# Altium PCB EVSE_Monitor.PcbDoc (part 1 of 2)
Units mm, origin at the board's own origin, x right, y up, seen from the top; angles counter-clockwise.
Board outline 130 x 100 mm, 2 copper layers (Top Layer, Bottom Layer), stack 1.581 mm thick; 132 components, 83 nets, 447 pads, 252 vias.
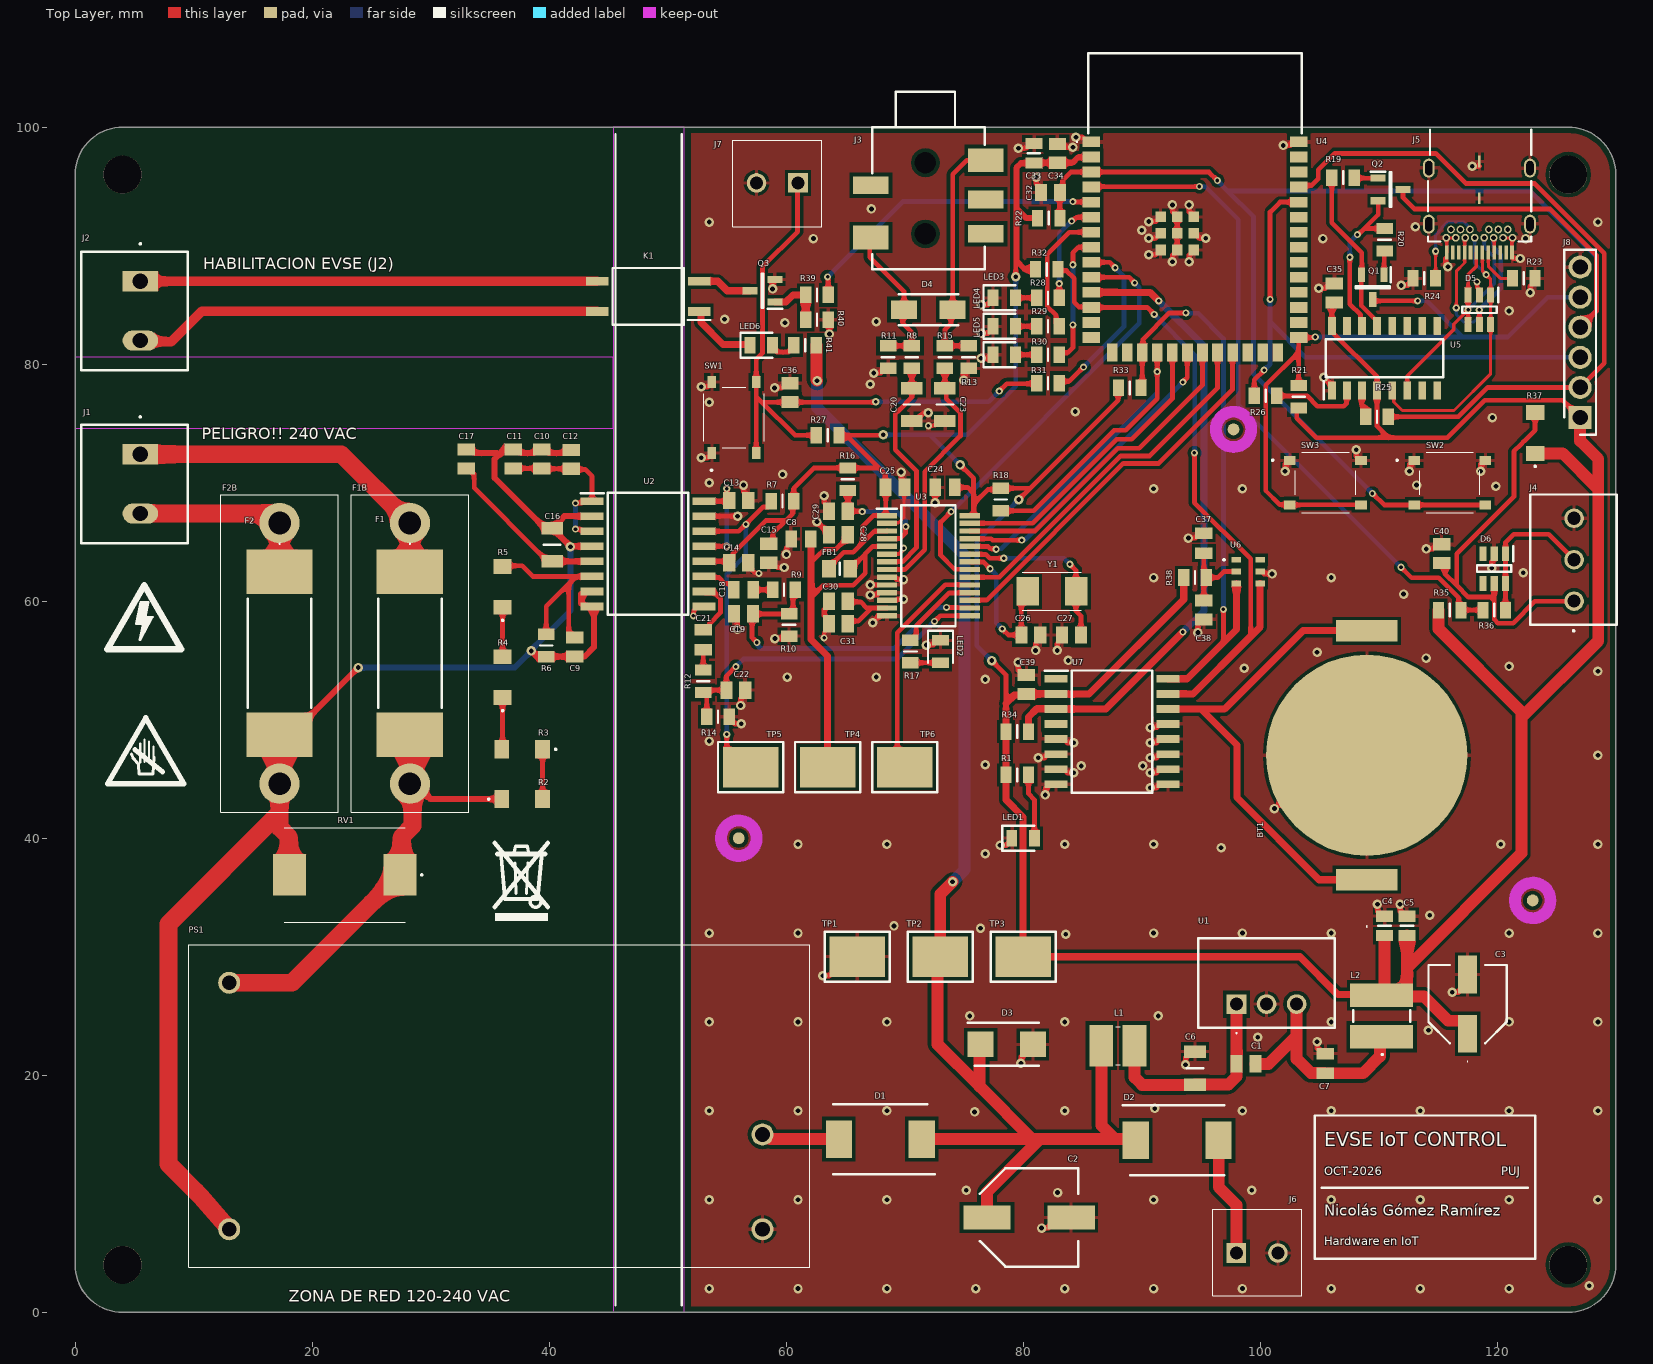
[diagram p0: Top Layer view]
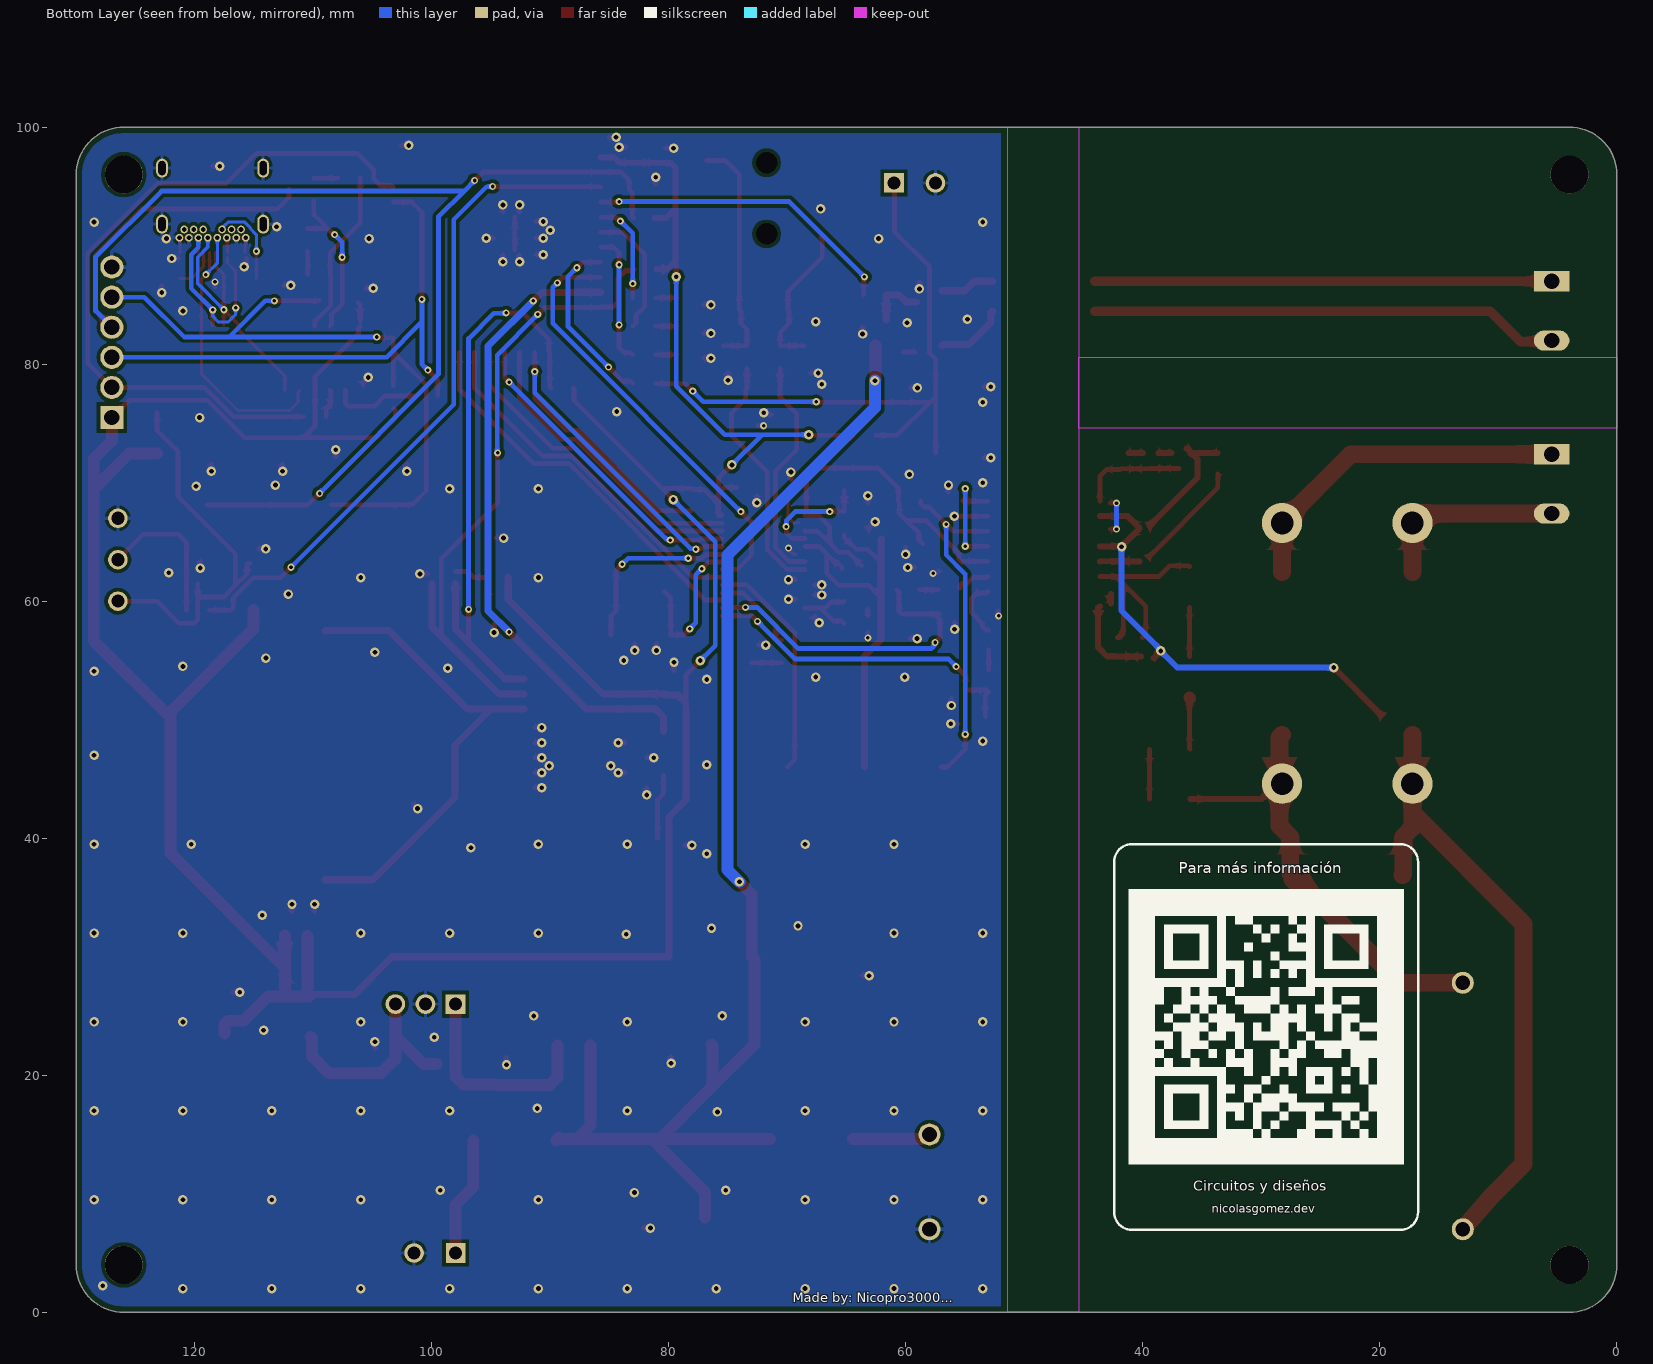
[diagram p1: Bottom Layer view, seen from below]
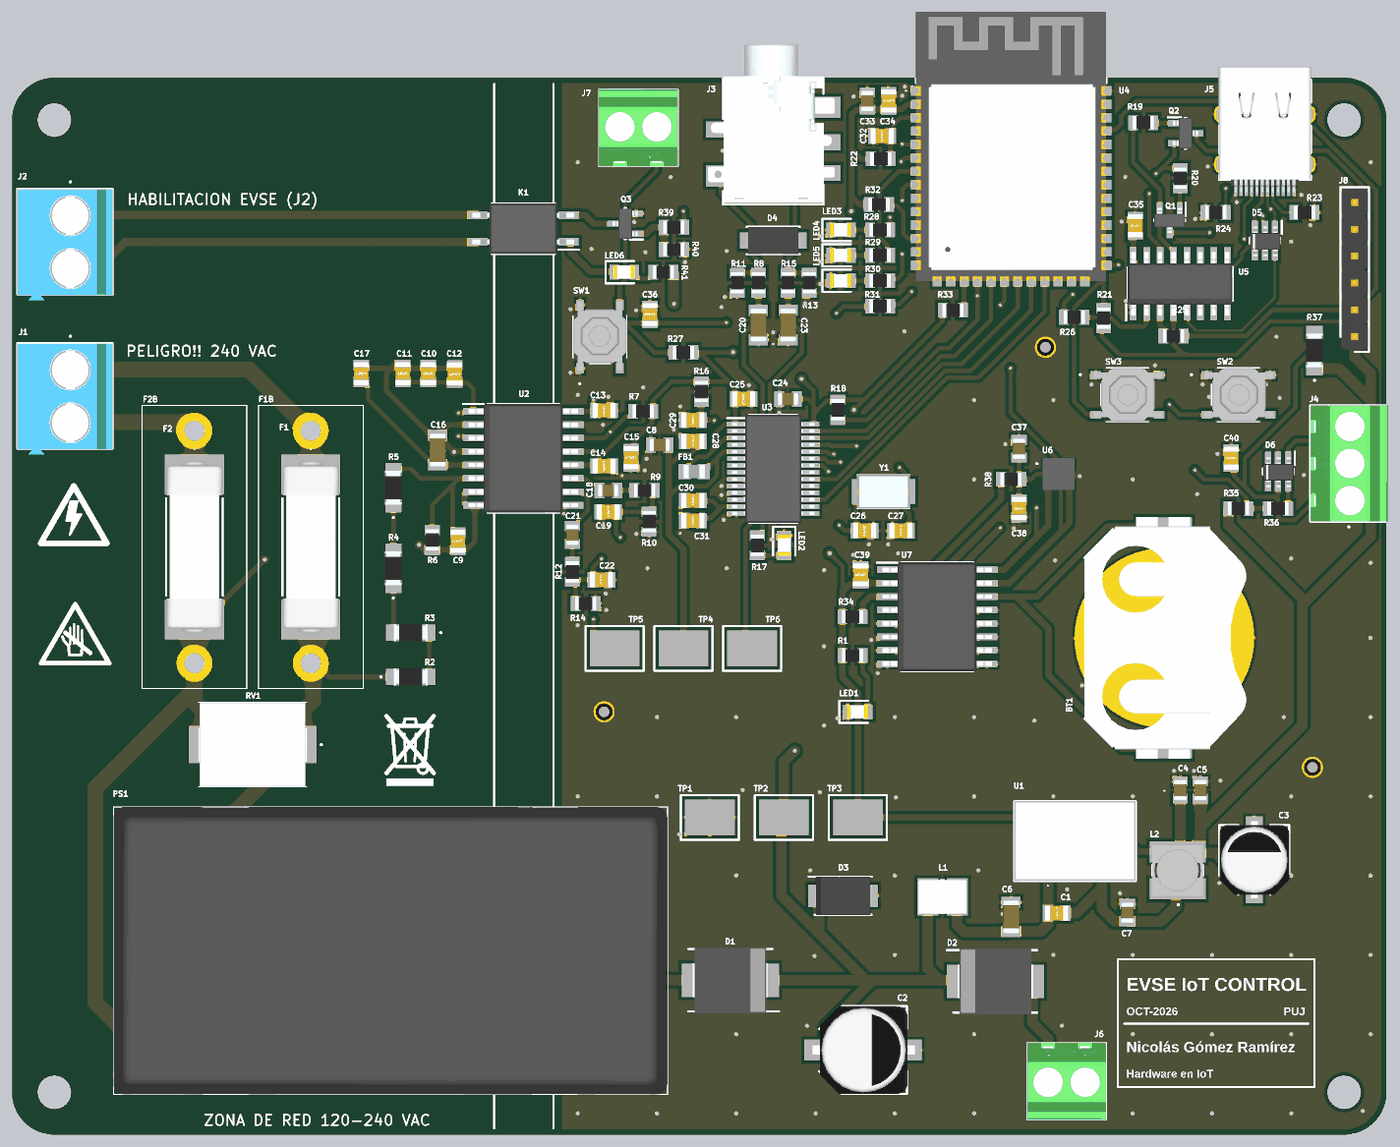
[diagram p3: 3D render of the assembled board from above, using the file's embedded part models]

## Layer stack, top to bottom
Top Solder: solder mask 0.0102, Solder Resist, Dk 3.5
Top Layer: signal copper 0.0356
Dielectric 1: dielectric 1.51, FR-4, Dk 4.4
Bottom Layer: signal copper 0.0356
Bottom Solder: solder mask 0.0102, Solder Resist, Dk 3.5

## Board outline
4,0 126,0 ccw(c126,4) 130,4 130,96 ccw(c126,96) 126,100 4,100 ccw(c4,96) 0,96 0,4 ccw(c4,4)

## Design rules (kind name [scope] priority, off if disabled: settings)
BoardOutlineClearance Borde_HV [InNetClass('HV_AC') Or InNetClass('EVSE_EXT')] p1: gap=1 ignorepadtopadclearanceinfootprint=FALSE // Red y EVSE: 1 mm al borde
BoardOutlineClearance [All] p2: gap=0.3 ignorepadtopadclearanceinfootprint=FALSE // PCBWay >= 0,25 mm
Clearance HV_SELV [InNetClass('HV_AC') vs Not InNetClass('HV_AC') And Not IsKeepOut] p1: gap=6.4 ignorepadtopadclearanceinfootprint=FALSE // Red - resto (incluido GND): reforzado, 6,4 mm
Clearance EVSE_resto [InNetClass('EVSE_EXT') vs Not InNetClass('EVSE_EXT') And Not IsKeepOut] p2: gap=6.4 ignorepadtopadclearanceinfootprint=FALSE // J2 de potencial desconocido: 6,4 mm a todo
Clearance L1_L2 [InNet('AC_L1') Or InNet('AC_L1_F') Or InNet('HV_D1') Or InNet('HV_D2') vs InNet('AC_L2') Or InNet('AC_L2_F') Or InNet('HV_INP') Or InNet('HV_DCDC') Or InNet('HV_LDO')] p3: gap=3.2 ignorepadtopadclearanceinfootprint=FALSE // Funcional L1-L2 (hasta 373 Vpk)
Clearance EVSE_pads_K1 [InNet('EVSE_EN_A') And InComponent('K1') vs InNet('EVSE_EN_B') And InComponent('K1')] p4: gap=1.7 ignorepadtopadclearanceinfootprint=FALSE // Pads 3 y 4 de K1 (1,79 mm)
Clearance EVSE_A_B [InNet('EVSE_EN_A') vs InNet('EVSE_EN_B')] p5: gap=1.5 ignorepadtopadclearanceinfootprint=FALSE // Salida de K1 (hasta 400 Vpk)
Clearance HV_interna [InNetClass('HV_AC') vs InNetClass('HV_AC')] p6: gap=0.5 ignorepadtopadclearanceinfootprint=FALSE // Dentro de la red (escalones de 93 Vpk; U2 0,62 mm)
Clearance J5_pads [InComponent('J5') vs InComponent('J5')] p7: gap=0.145 ignorepadtopadclearanceinfootprint=FALSE // Patron de Wurth: pads de 0,65 mm a 0,8 mm (0,15 mm entre pads)
Clearance Poligono_GND [InPolygon] p8: gap=0.3 ignorepadtopadclearanceinfootprint=FALSE // Poligonos de GND a 0,3 mm del resto
Clearance [All] p9: gap=0.2 ignorepadtopadclearanceinfootprint=FALSE // General SELV (PCBWay 0,1 mm)
ComponentClearance Cautin_K1 [InComponent('K1')] p1: gap=2 collisioncheckmode=3 verticalgap=2 showdistances=FALSE // K1 se suelda a mano por arriba: 2 mm libres (U1 es THT)
ComponentClearance F1B_anidado [InComponent('F1B') vs Not (InComponent('F1') Or InComponent('F1B'))] p2: gap=0.25 collisioncheckmode=3 verticalgap=0.25 showdistances=FALSE // F1B (DNP) va sobre F1: solo se revisa contra el resto
ComponentClearance F2B_anidado [InComponent('F2B') vs Not (InComponent('F2') Or InComponent('F2B'))] p3: gap=0.25 collisioncheckmode=3 verticalgap=0.25 showdistances=FALSE // F2B (DNP) va sobre F2: solo se revisa contra el resto
ComponentClearance [Not (InComponent('F1B') Or InComponent('F2B')) vs Not (InComponent('F1B') Or InComponent('F2B'))] p4: gap=0.25 collisioncheckmode=3 verticalgap=0.25 showdistances=FALSE // Cuerpos SMD: 0,25 mm
Creepage Creepage_HV [InNetClass('HV_AC') vs Not InNetClass('HV_AC')] p1: checkdistance=6.4 applytopolygonpour=TRUE // Reforzado red - SELV
Creepage Creepage_EVSE [InNetClass('EVSE_EXT') vs Not InNetClass('EVSE_EXT')] p2: checkdistance=6.4 applytopolygonpour=TRUE // J2 de potencial desconocido
Creepage Creepage_L1_L2 [InNet('AC_L1') Or InNet('AC_L1_F') Or InNet('HV_D1') Or InNet('HV_D2') vs InNet('AC_L2') Or InNet('AC_L2_F') Or InNet('HV_INP') Or InNet('HV_DCDC') Or InNet('HV_LDO')] p3: checkdistance=3.2 applytopolygonpour=TRUE // Funcional L1-L2
DiffPairsRouting USB_90 [All] p1: maxlimit=0.25 minlimit=0.15 mostfreqgap=0.15 toplayer_minwidth=0.2 toplayer_maxwidth=0.55 toplayer_prefwidth=0.5 bottomlayer_minwidth=0.2 bottomlayer_maxwidth=0.55 bottomlayer_prefwidth=0.5 maxuncoupledlength=30 // USB Full Speed: 0,50 / 0,15 / GND 0,15 -> 92,6 ohm; 30 mm sin acoplar (FS no es critico)
HoleSize [All] p1: absolutevalues=TRUE maxlimit=6 minlimit=0.3 maxpercent=80.000 minpercent=20.000 // PCBWay sin costo extra: 0,3-6,0 mm
HoleToHoleClearance [All] p1: gap=0.4 allowstackedmicrovias=TRUE // PCBWay: 0,41 mm entre agujeros de piezas
MinimumAnnularRing Anillo_J5 [InComponent('J5')] p1: minimumring=0.12 // Wurth: agujero 0,4 / pad 0,65 (pin 0,28 x 0,25); pedir a PCBWay que no lo cambie
MinimumAnnularRing Anillo [All] p2: minimumring=0.15 // PCBWay: anillo >= 0,15 mm
MinimumSolderMaskSliver Mascara_J5 [InComponent('J5')] p1: minsoldermaskwidth=0 // Pads de J5 a 0,8 mm: apertura de mascara corrida
MinimumSolderMaskSliver [All] p2: minsoldermaskwidth=0.1 // Puente de mascara verde >= 0,1 mm
PolygonConnect Polygon_vias [IsVia] p1: connectstyle=Direct reliefconductorwidth=0.3 reliefentries=4 polygonreliefangle="90 Angle" airgapwidth=0.25 // Vias directas al poligono
PolygonConnect [All] p2: connectstyle=Relief reliefconductorwidth=0.3 reliefentries=4 polygonreliefangle="90 Angle" airgapwidth=0.25 // Pads con 4 rayos de 0,3 mm (se sueldan bien)
RoutingVias Vias_potencia [InNet('AC_L1') Or InNet('AC_L2') Or InNet('AC_L1_F') Or InNet('AC_L2_F') Or InNet('+VIN') Or InNet('VIN_ACDC') Or InNet('VIN_BANCO') Or InNet('+3V3') Or InNet('+3V3A') Or InNet('GND')] p1: holewidth=0.4 width=0.8 viastyle="Through Hole" minholewidth=0.3 minwidth=0.6 maxholewidth=0.4 maxwidth=0.8 // Potencia: 0,4 / 0,8 mm
RoutingVias Vias [All] p2: holewidth=0.3 width=0.6 viastyle="Through Hole" minholewidth=0.3 minwidth=0.6 maxholewidth=0.4 maxwidth=0.8 // Senal: 0,3 / 0,6 mm (anillo 0,15)
SilkToSilkClearance [All] p1: silktosilkclearance=0 // Sin revision serigrafia-serigrafia
SilkToSolderMaskClearance [All] p1: minsilkscreentomaskgap=0.05 clearancetoexposedcopper=FALSE // PCBWay recorta la serigrafia sobre pads
SolderMaskExpansion Vias_tapadas [IsVia] p1: expansion=0 istentingtop=TRUE // Vias tapadas con mascara en Top y Bottom
SolderMaskExpansion [All] p2: expansion=0.05 istentingtop=FALSE // PCBWay: apertura >= 2 mil
SupplyNets "Schematic Supply Nets_3" [InNet('+VIN')] p1: voltage=0.000
SupplyNets "Schematic Supply Nets_2" [InNet('+3V3A')] p2: voltage=0.000
SupplyNets "Schematic Supply Nets_1" [InNet('GND')] p3: voltage=0.000
SupplyNets "Schematic Supply Nets" [InNet('+3V3')] p4: voltage=0.000
Width Ancho_USB [InNet('USB_DP') Or InNet('USB_DN')] p1: maxlimit=0.6 minlimit=0.2 preferedwidth=0.3 // USB Full Speed: 0,3 mm para entrar a los pads de J5 (0,3 mm)
Width Ancho_red [InNet('AC_L1') Or InNet('AC_L2') Or InNet('AC_L1_F') Or InNet('AC_L2_F')] p2: maxlimit=3 minlimit=0.5 preferedwidth=1.5 // Troncos de red 1,5 mm; ramales a U2 y condensadores 0,5
Width Ancho_HV [InNetClass('HV_AC')] p3: maxlimit=3 minlimit=0.3 preferedwidth=0.4 // Senales del lado de red
Width Ancho_EVSE [InNetClass('EVSE_EXT')] p4: maxlimit=2 minlimit=0.4 preferedwidth=0.8 // Salida de K1 <= 120 mA
Width Ancho_12V [InNet('+VIN') Or InNet('VIN_ACDC') Or InNet('VIN_BANCO')] p5: maxlimit=2.5 minlimit=0.5 preferedwidth=1 // 12 V hasta 1,67 A: troncos 1,0; ramal a R41 0,5
Width Ancho_3V3 [InNet('+3V3') Or InNet('+3V3A')] p6: maxlimit=2 minlimit=0.25 preferedwidth=0.4 // 3,3 V <= 0,5 A (0,4 entra a los pads de U3)
Width Ancho_GND [InNet('GND')] p7: maxlimit=3 minlimit=0.25 preferedwidth=0.3 // GND: pistas finas, los poligonos lo refuerzan
Width [All] p8: maxlimit=2 minlimit=0.2 preferedwidth=0.25 // Senales
23 further rules are at their usual default settings.

## Classes and differential pairs
net class USB: USB_DN USB_DP
net class HV_AC: AC_L1 AC_L1_F AC_L2 AC_L2_F HV_D1 HV_D2 HV_D3 HV_DCDC HV_INP HV_LDO
net class EVSE_EXT: EVSE_EN_A EVSE_EN_B
net class ANALOG: AMC_OUTN AMC_OUTP ATM_IN ATM_IP ATM_VN ATM_VP CT_N CT_P NetC18_2 NetC21_2 NetJ3_3 NetJ3_11
component class SENSORES: BT1 C37 C38 C39 C40 D6 J4 R32 R33 R34 R35 R36 R37 R38 U6 U7
component class MEDICION: C9 C10 C11 C12 C13 C14 C15 C16 C17 C18 C19 C20 C21 C22 C23 C24 C25 C26 C27 C28 C29 C30 C31 D4 J3 LED2 R2 R3 R4 R5 R6 R7 R8 R9 R10 R11 R12 R13 R14 R15 R16 R17 R18 TP5 TP6 U2 U3 Y1
component class MCU: C32 C33 C34 C35 C36 D5 J5 J7 J8 LED3 LED4 LED5 Q1 Q2 R19 R20 R21 R22 R23 R24 R25 R26 R27 R28 R29 R30 R31 SW1 SW2 SW3 U4 U5
component class ALIMENTACION: C1 C2 C3 C4 C5 C6 C7 C8 D1 D2 D3 F1 F1B F2 F2B FB1 J1 J6 L1 L2 LED1 PS1 R1 RV1 TP1 TP2 TP3 TP4 U1
component class ACTUACION: J2 K1 LED6 Q3 R39 R40 R41
differential pair USB_D: +USB_DP -USB_DN

## Components (designator, comment, footprint, x,y, rotation, side; value= is the part's Value field where it differs from the comment)
BT1 "BAT-HLD-001" BATHLD001 109,47 r90 top value=CR2032
C1 "C0805C102J5GAC-TU" CAPC2012X88N 98.806,20.955 r180 top value="1nF 50V C0G"
C2 "EEE-FK1V101P" EEHZT1E331UP 80.5,8 r0 top value="100uF 35V"
C3 "EEE-FK1C101P" EEE1AA101SP 117.5,26 r90 top value="100uF 16V"
C4 "CL21A226MAQNNNE" CAPC2012X140N 110.5,32.6 r90 top value="22uF 25V"
C5 "CL21A226MAQNNNE" CAPC2012X140N 112.4,32.6 r90 top value="22uF 25V"
C6 "CL31B106KBHNNNE" CAPC3216X180N 94.5,20.6 r90 top value="10uF 50V"
C7 "CL21A106KAYNNNE" CAPC2012X145N 105.5,21 r90 top value="10uF 25V"
C8 "CL21A106KAYNNNE" CAPC2012X145N 61.25,65.25 r180 top value="10uF 25V"
C9 "C0805C102J5GAC-TU" CAPC2012X88N 42.164,56.134 r270 top value="1nF 50V C0G"
C10 "CL21B105KAFNNNE" CAPC2012X88N 39.37,72.009 r90 top value="1uF 25V X7R"
C11 "C0805C102J5GAC-TU" CAPC2012X88N 36.957,72.009 r90 top value="1nF 50V C0G"
C12 "CL21B104KBCNNNC" CAPC2012X88N 41.857,71.975 r90 top value="100nF 50V X7R"
C13 "CL21B104KBCNNNC" CAPC2012X88N 56,68.5 r0 top value="100nF 50V X7R"
C14 "CL21B105KAFNNNE" CAPC2012X88N 56,63.25 r0 top value="1uF 25V X7R"
C15 "C0805C102J5GAC-TU" CAPC2012X88N 58.547,64.046 r270 top value="1nF 50V C0G"
C16 "GRM31C5C1H104JA01L" CAPC3216X180N 40.259,64.77 r90 top value="100nF 50V C0G"
C17 "C0805C102J5GAC-TU" CAPC2012X88N 33.02,72.009 r90 top value="1nF 50V C0G"
C18 "CL21A106KAYNNNE" CAPC2012X145N 56.388,60.96 r0 top value="10uF 25V"
C19 "C0805C472J5GACTU" CAPC2012X88N 56.388,58.928 r180 top value="4.7nF 50V C0G"
C20 "GRM3195C1H333JA01D" CAPC3216X180N 70.6,76.6 r270 top value="33nF 50V C0G"
C21 "CL21A106KAYNNNE" CAPC2012X145N 53,56.75 r270 top value="10uF 25V"
C22 "C0805C472J5GACTU" CAPC2012X88N 55.75,52.5 r0 top value="4.7nF 50V C0G"
C23 "GRM3195C1H333JA01D" CAPC3216X180N 73.4,76.6 r270 top value="33nF 50V C0G"
C24 "CL21A106KAYNNNE" CAPC2012X145N 73.4,69.6 r180 top value="10uF 25V"
C25 "CL21B104KBCNNNC" CAPC2012X88N 69.2,69.6 r0 top value="100nF 50V X7R"
C26 "C0805C120J5GACTU" CAPC2012X88N 80.645,57.15 r0 top value="12pF 50V C0G"
C27 "C0805C120J5GACTU" CAPC2012X88N 84.074,57.15 r180 top value="12pF 50V C0G"
C28 "CL21B104KBCNNNC" CAPC2012X88N 64.4,65.6 r180 top value="100nF 50V X7R"
C29 "CL21B104KBCNNNC" CAPC2012X88N 64.4,67.6 r180 top value="100nF 50V X7R"
C30 "CL21B105KAFNNNE" CAPC2012X88N 64.4,60 r180 top value="1uF 25V X7R"
C31 "C0805C102J5GAC-TU" CAPC2012X88N 64.4,58.1 r180 top value="1nF 50V C0G"
C32 "CL21B105KAFNNNE" CAPC2012X88N 82.296,94.488 r0 top value="1uF 25V X7R"
C33 "CL21A226MAQNNNE" CAPC2012X140N 80.9,97.8 r270 top value="22uF 25V"
C34 "CL21B104KBCNNNC" CAPC2012X88N 82.9,97.8 r270 top value="100nF 50V X7R"
C35 "CL21B104KBCNNNC" CAPC2012X88N 106.25,86 r270 top value="100nF 50V X7R"
C36 "CL21B104KBCNNNC" CAPC2012X88N 60.325,77.597 r270 top value="100nF 50V X7R"
C37 "CL21A106KAYNNNE" CAPC2012X145N 95.25,64.897 r270 top value="10uF 25V"
C38 "CL21B104KBCNNNC" CAPC2012X88N 95.25,59.25 r90 top value="100nF 50V X7R"
C39 "CL21B104KBCNNNC" CAPC2012X88N 80.264,52.959 r270 top value="100nF 50V X7R"
C40 "CL21B104KBCNNNC" CAPC2012X88N 115.316,64.008 r270 top value="100nF 50V X7R"
D1 "SS34-E3_57T" DIOM7959X262N 67.945,14.605 r180 top value="40V 3A"
D2 "SS34-E3_57T" DIOM7959X262N 93,14.5 r0 top value="40V 3A"
D3 "SMBJ15A" DIOM5436X244N 78.613,22.606 r0 top value="15V 600W"
D4 "SMAJ5.0CA" DIONM5026X229N 72,84.6 r180 top value="5V TVS bidir"
D5 "USBLC6-2SC6" SOT95P280X145-6N 118.5,84.6 r270 top value="ESD USB"
D6 "USBLC6-2SC6" SOT95P280X145-6N 119.75,62.75 r270 top value="ESD USB"
F1 "3403.0274.11" 3403027423 28.25,55.6 r270 top value="T1A 277VAC"
F1B "BLX-A" BLX-A_5X20 28.25,55.6 r270 top value="5x20 6.3A 250V"
F2 "3403.0274.11" 3403027423 17.25,55.6 r270 top value="T1A 277VAC"
F2B "BLX-A" BLX-A_5X20 17.25,55.6 r270 top value="5x20 6.3A 250V"
FB1 "BLM21PG221SN1D" BEADC2012X105N 64.516,62.738 r0 top value=220R@100MHz
J1 "XY301V-A-5.0-2P" TB001-500-02BE 5.5,72.4 r90 top value="2P 5.0mm 300V"
J2 "XY301V-A-5.0-2P" TB001-500-02BE 5.5,87 r90 top value="2P 5.0mm 300V"
J3 "SJ1-3515-SMT-TR" SJ13515SMTTR 72,95.5 r0 top value="jack 3.5mm"
J4 "1751251" 1751251 126.5,60 r90 top value="3P 3.5mm"
J5 "632723300011" 632723300011 118.5,95.35 r180 top value="USB-C 16P USB2.0"
J6 "1751248" 1751248 98,5 r0 top value="2P 3.5mm"
J7 "1751248" 1751248 61,95.3 r180 top value="2P 3.5mm"
J8 "61300611121" HDRV6W79P0X254_1X6_1524X254X894P 127,75.5 r90 top value="1x6 2.54mm"
K1 "AQY414EHAX" SOP254P962X315-4N 48.35,85.73 r180 top value="NC 400V 120mA"
L1 "LQH43NH120J03L" RLS126 88,22.5 r0 top value=12uH
L2 "SRR4028-2R2Y" SRR4028 110.25,25 r0 top value=2.2uH
LED1 "APT2012SGC" LEDC2012X85N 80,40 r0 top value=verde
LED2 "APT2012SGC" LEDC2012X85N 73.025,55.753 r270 top value=verde
LED3 "APT2012SGC" LEDC2012X85N 78.4,85.6 r0 top value=verde
LED4 "APT2012SGC" LEDC2012X85N 78.4,83.2 r0 top value=verde
LED5 "APT2012SURCK" LEDC2012X85N 78.4,80.8 r0 top value=rojo
LED6 "KT-0805Y" LEDC2012X85N 57.9,81.6 r0 top value=amarillo
PS1 "IRM-20-12" IRM2012 13,7 r0 top value="12V 1.8A"
Q1 "MMBT3904LT1G" SOT96P237X111-3N 109.5,86.5 r270 top value="NPN 40V 0.2A"
Q2 "MMBT3904LT1G" SOT96P237X111-3N 111,94.75 r0 top value="NPN 40V 0.2A"
Q3 "AO3400A" SOT96P237X111-3N 58,86.2 r180 top value="NMOS 30V 5.7A"
R1 "RC0805FR-071KL" RESC2012X60N 79.502,45.339 r0 top value=1k
R2 "ERJ-P08F1004V" ERJP08_(1206) 37.719,43.307 r0 top value="1M 1206"
R3 "ERJ-P08F1004V" ERJP08_(1206) 37.719,47.498 r180 top value="1M 1206"
R4 "ERJ-P08F1004V" ERJP08_(1206) 36.068,53.594 r90 top value="1M 1206"
R5 "ERJ-P08F1004V" ERJP08_(1206) 36.068,61.214 r90 top value="1M 1206"
R6 "ERA-6AEB103V" RESC2012X60N 39.751,56.261 r270 top value="10k 0.1%"
R7 "RC0805FR-0747KL" RESC2012X60N 59.69,68.453 r180 top value=47k
R8 "RC0805FR-071KL" RESC2012X60N 70.6,80.6 r270 top value=1k
R9 "ERA-6AEB203V" RESC2012X60N 59.817,60.96 r0 top value="20k 0.1%"
R10 "ERA-6AEB133V" RESC2012X60N 60.25,58 r270 top value="13k 0.1%"
R11 "RT0805BRD0710RL" RESC2012X60N 68.6,80.6 r90 top value="10R 0.1%"
R12 "ERA-6AEB203V" RESC2012X60N 53,53.25 r270 top value="20k 0.1%"
R13 "RT0805BRD0710RL" RESC2012X60N 75.4,80.6 r270 top value="10R 0.1%"
R14 "ERA-6AEB133V" RESC2012X60N 54.25,50.25 r0 top value="13k 0.1%"
R15 "RC0805FR-071KL" RESC2012X60N 73.4,80.6 r270 top value=1k
R16 "RC0805FR-0710KL" RESC2012X60N 65.2,70.3 r270 top value=10k
R17 "RC0805FR-071KL" RESC2012X60N 70.485,55.753 r270 top value=1k
R18 "RC0805FR-0710KL" RESC2012X60N 78.105,68.58 r270 top value=10k
R19 "RC0805FR-0712KL" RESC2012X60N 107,95.75 r0 top value=12k
R20 "RC0805FR-0712KL" RESC2012X60N 110.5,90.5 r270 top value=12k
R21 "RC0805FR-074K7L" RESC2012X60N 103.25,77.25 r270 top value=4.7k
R22 "RC0805FR-0710KL" RESC2012X60N 82.169,92.329 r180 top value=10k
R23 "RC0805FR-075K1L" RESC2012X60N 122.25,87.25 r180 top value=5.1k
R24 "RC0805FR-075K1L" RESC2012X60N 113.853,87.249 r0 top value=5.1k
R25 "RC0805FR-071KL" RESC2012X60N 109.855,75.565 r180 top value=1k
R26 "RC0805FR-071KL" RESC2012X60N 100.457,77.343 r180 top value=1k
R27 "RC0805FR-0710KL" RESC2012X60N 63.5,74 r0 top value=10k
R28 "RC0805FR-071KL" RESC2012X60N 82.1,85.6 r0 top value=1k
R29 "RC0805FR-071KL" RESC2012X60N 82.1,83.2 r0 top value=1k
R30 "RC0805FR-071KL" RESC2012X60N 82.1,80.8 r0 top value=1k
R31 "RC0805FR-071KL" RESC2012X60N 82.1,78.4 r0 top value=1k
R32 "RC0805FR-074K7L" RESC2012X60N 82,88 r180 top value=4.7k
R33 "RC0805FR-074K7L" RESC2012X60N 89,78 r180 top value=4.7k
R34 "RC0805FR-0710KL" RESC2012X60N 79.5,49 r0 top value=10k
R35 "RC0805FR-074K7L" RESC2012X60N 116,59.25 r180 top value=4.7k
R36 "RC0805FR-07100RL" RESC2012X60N 119.75,59.25 r0 top value=100R
R37 "RC1206FR-0768RL" ERJP08_(1206) 123.2,74.2 r90 top value="68R 1206"
R38 "RC0805FR-07330RL" RESC2012X60N 94.5,62 r0 top value=330R
R39 "RC0805FR-071KL" RESC2012X60N 62.6,85.85 r180 top value=1k
R40 "RC0805FR-0710KL" RESC2012X60N 62.6,83.75 r180 top value=10k
R41 "RC0805FR-071KL" RESC2012X60N 61.6,81.6 r0 top value=1k
RV1 "RL4032P471KJ" CU4032 22.75,36.9 r180 top value=300VAC
SW1 "TS-1187A-B-A-B" TS1187ABAB 55.6,75.5 r90 top value="pulsador 5.1mm"
SW2 "TS-1187A-B-A-B" TS1187ABAB 116,70 r0 top value="pulsador 5.1mm"
SW3 "TS-1187A-B-A-B" TS1187ABAB 105.5,70 r0 top value="pulsador 5.1mm"
TP1 "5016" KEYSTONE-5016_V 66,30 r0 top value=TP
TP2 "5016" KEYSTONE-5016_V 73,30 r0 top value=TP
TP3 "5016" KEYSTONE-5016_V 80,30 r0 top value=TP
TP4 "5016" KEYSTONE-5016_V 63.5,46 r0 top value=TP
TP5 "5016" KEYSTONE-5016_V 57,46 r0 top value=TP
TP6 "5016" KEYSTONE-5016_V 70,46 r0 top value=TP
U1 "R-78CK3.3-0.5" R78CK3305 98,26 r0 top value="3.3V 0.5A"
U2 "AMC3330DWER" SOIC127P1030X265-16N 48.35,64 r0 top value="±1V iso amp"
U3 "ATM90E26-YU-R" SOP65P778X199-28N 72,63 r0 top value="energy meter"
U4 "ESP32-S3-WROOM-1-N16R2" ESP32S3WROOM1N16R2 94.5,93.5 r0 top value="N16R2 16MB/2MB"
U5 "CH340C" SOIC127P600X175-16N 110.5,80.5 r90 top value=USB-UART
U6 "AHT20" AHT20 99,62.5 r0 top value="T/HR I2C 0x38"
U7 "DS3231SN" SOIC127P1030X265-16N 87.5,49 r0 top value="RTC TCXO 2ppm"
Y1 "ECS-81.92-12-30Q-EN-TR" ECS81921230QENTR 82.423,60.833 r180 top value="8.192MHz 12pF"

## Footprints (in the part's own frame and the unit in brackets; to place one, negate y for a bottom-side part, rotate by r counter-clockwise, add the part's x,y. Pads: shape width x height; smd on the part's side, far side on the other; paste and mask are expansions set on the pad)
1751248 [mm]
  rect 1.65x1.65 hole 1.1: 1(0,0)
  round 1.65 hole 1.1: 2(3.5,0)
  silkscreen extent -2,-3.6 5.5,3.7, body extent -2,-3.6 5.5,3.7, height 8.5
1751251 [mm]
  round 1.65 hole 1.1: 1(0,0) 2(3.5,0) 3(7,0)
  silkscreen extent -2.55,-3.6 9,3.7, body extent -2,-3.6 9,3.7, height 8.5
3403027423 [mm]
  rect 3.75x5.6 smd: 1(-6.875,0) 2(6.875,0)
  silkscreen extent -9.3,-2.68 4.6,2.68, body extent -8.1,-2.68 8.1,2.68, height 5.36
632723300011 [mm] "USB 3.1 Type C Receptacle Horizontal THR"
  rect 0.3x1.2 smd: A1(-2.75,5.93) A2(-2.25,5.93) A3(-1.75,5.93) A4(-1.25,5.93) A5(-0.75,5.93) A6(-0.25,5.93) A7(0.25,5.93) A8(0.75,5.93) A9(1.25,5.93) A10(1.75,5.93) A11(2.25,5.93) A12(2.75,5.93)
  round 0.65 hole 0.4: B1(2.8,4.68) B2(2.4,3.98) B3(1.6,3.98) B4(1.2,4.68) B5(0.8,3.98) B6(0.4,4.68) B7(-0.4,4.68) B8(-0.8,3.98) B9(-1.2,4.68) B10(-1.6,3.98) B11(-2.4,3.98) B12(-2.8,4.68) Shell(-2,4.68) Shell(2,4.68)
  oval 1x1.6 hole 0.6 slot 1.2 at 90 deg: Shell(-4.27,3.53) Shell(-4.27,-1.2) Shell(4.27,3.53) Shell(4.27,-1.2)
  rect 0.2x1 smd: Shell(0,1.35) Shell(0,-1.75)
  silkscreen extent -4.37,-4.45 4.34,5, body extent -4.37,-5.62 4.37,6.2, height 3.05
AHT20 [mm]
  rect 0.8x0.5 smd: 1(-1,1) 2(-1,0) 3(-1,-1) 4(1,-1) 5(1,0) 6(1,1)
  silkscreen extent -2.1,0.95 -2,1.05, body extent -1.5,-1.5 1.5,1.5, height 1.2
BATHLD001 [mm]
  rect 1.8x5.2 smd: 1(-10.5,0) 2(10.5,0)
  round 17 smd paste-8.5: 3(0,0)
  silkscreen extent -14.5,-0.05 -14.4,0.05, body extent -11.43,-7.75 11.43,7.74, height 4.32
BEADC2012X105N [mm]
  rect 1.15x1.45 smd: 1(-0.9,0) 2(0.9,0)
  silkscreen extent 0,-0.53 0,0.53, body extent -1,-0.63 1,0.63, height 1.05
BLX-A_5X20 [mm] "Portafusible 5x20 BLX-A, pines a 22 mm"
  round 3.4 hole 1.9: 1(-11,0) 2(11,0)
  silkscreen extent -13.4,-4.95 13.4,4.95
CAPC2012X88N [mm]
  rect 1.02x1.47 smd: 1(-0.8,0) 2(0.8,0)
  body extent -1.1,-0.72 1.1,0.73, height 0.88
CAPC2012X140N [mm]
  rect 0.94x1.43 smd: 1(-0.82,0) 2(0.82,0)
  silkscreen extent 0,-0.53 0,0.53, body extent -1,-0.63 1,0.63, height 1.4
CAPC2012X145N [mm]
  rect 0.97x1.47 smd: 1(-0.83,0) 2(0.83,0)
  body extent -1,-0.63 1,0.63, height 1.45
CAPC3216X180N [mm]
  rect 1.05x1.82 smd: 1(-1.39,0) 2(1.39,0)
  silkscreen extent 0,-0.7 0,0.7, body extent -1.6,-0.8 1.6,0.8, height 1.8
CU4032 [mm]
  rect 2.8x3.5 smd: 1(-4.65,0) 2(4.65,0)
  silkscreen extent -6.55,-4 5.1,4, body extent -5.15,-4 5.15,4, height 3.46
DIOM5436X244N [mm]
  rect 2.2x2.15 smd: 1(-2.2,0) 2(2.2,0)
  silkscreen extent -3.27,-1.81 2.7,1.81, body extent -2.7,-1.81 2.7,1.81, height 2.44
DIOM7959X262N [mm]
  rect 2.2x3.15 smd: 1(-3.5,0) 2(3.5,0)
  silkscreen extent -4.6,-2.95 3.97,2.95, body extent -3.56,-3.11 3.56,3.11, height 2.67
DIONM5026X229N [mm]
  rect 2.2x1.55 smd: 1(-2.05,0) 2(2.05,0)
  silkscreen extent -2.52,-1.3 2.52,1.3, body extent -2.52,-1.3 2.52,1.3, height 2.29
ECS81921230QENTR [mm]
  rect 1.9x2.4 smd: 1(-2.05,0) 2(2.05,0)
  silkscreen extent -2.5,-1.6 2.5,1.6, body extent -2.54,-1.6 2.5,1.6, height 1.1
EEE1AA101SP [mm]
  rect 3.2x1.6 smd: 1(-2.5,0) 2(2.5,0)
  silkscreen extent -4.88,-3.3 3.3,3.3, body extent -3.65,-3.3 3.65,3.3, height 5.8
EEHZT1E331UP [mm]
  rect 4x2 smd: 1(-3.55,0) 2(3.55,0)
  silkscreen extent -4.15,-4.15 4.15,4.15, body extent -4.79,-4.15 4.91,4.15, height 10.2
ERJP08_(1206) [mm]
  rect 1.25x1.55 smd: 1(-1.725,0) 2(1.725,0)
  silkscreen extent -2.87,-0.05 -2.78,0.05, body extent -1.6,-0.8 1.6,0.8, height 0.6
ESP32S3WROOM1N16R2 [mm]
  rect 1.5x0.9 smd: 1(-8.75,5.26) 2(-8.75,3.99) 3(-8.75,2.72) 4(-8.75,1.45) 5(-8.75,0.18) 6(-8.75,-1.09) 7(-8.75,-2.36) 8(-8.75,-3.63) 9(-8.75,-4.9) 10(-8.75,-6.17) 11(-8.75,-7.44) 12(-8.75,-8.71) 13(-8.75,-9.98) 14(-8.75,-11.25) 27(8.75,-11.25) 28(8.75,-9.98) 29(8.75,-8.71) 30(8.75,-7.44) 31(8.75,-6.17) 32(8.75,-4.9) 33(8.75,-3.63) 34(8.75,-2.36) 35(8.75,-1.09) 36(8.75,0.18) 37(8.75,1.45) 38(8.75,2.72) 39(8.75,3.99) 40(8.75,5.26)
  rect 0.9x1.5 smd: 15(-6.985,-12.5) 16(-5.715,-12.5) 17(-4.445,-12.5) 18(-3.175,-12.5) 19(-1.905,-12.5) 20(-0.635,-12.5) 21(0.635,-12.5) 22(1.905,-12.5) 23(3.175,-12.5) 24(4.445,-12.5) 25(5.715,-12.5) 26(6.985,-12.5)
  rect 0.9x0.9 smd: 41(-1.5,-2.46) 42(-2.9,-1.06) 43(-2.9,-2.46) 44(-2.9,-3.86) 45(-1.5,-3.86) 46(-0.1,-3.86) 47(-0.1,-2.46) 48(-0.1,-1.06) 49(-1.5,-1.06)
  silkscreen extent -10,5.21 9,12.75, body extent -9,-12.75 9,12.75, height 3.25
HDRV6W79P0X254_1X6_1524X254X894P [mm]
  rect 1.95x1.95 hole 1.3: 1(0,0)
  round 1.95 hole 1.3: 2(2.54,0) 3(5.08,0) 4(7.62,0) 5(10.16,0) 6(12.7,0)
  silkscreen extent -1.45,-1.35 14.15,1.35, body extent -1.27,-1.27 13.97,1.27, height 8.54
IRM2012 [mm]
  round 1.86 hole 1.24: 1(0,0) 2(45,0) 3(45,8) 4(0,20.8)
  silkscreen extent -3.4,-3.2 49,24, body extent -3.42,-3.2 48.98,24, height 24
KEYSTONE-5016_V [mm] "Testpoint, Body 3.81x2.04 mm"
  rect 4.7x3.43 smd: 1(0,0)
  silkscreen extent -2.75,-2.12 2.75,2.11, body extent -1.9,-1.02 1.9,1.02, height 2.29
LEDC2012X85N [mm]
  rect 0.9x1.4 smd: 1(-0.95,0) 2(0.95,0)
  silkscreen extent -1.75,-1.05 0.95,1.05, body extent -1.03,-0.63 0.97,0.63, height 0.75
R78CK3305 [mm]
  rect 1.665x1.665 hole 1.11: 1(0,0)
  round 1.665 hole 1.11: 2(2.54,0) 3(5.08,0)
  silkscreen extent -3.21,-2.5 8.29,5.55, body extent -3.21,-2 8.29,5.55, height 10.43
RESC2012X60N [mm]
  rect 0.95x1.4 smd: 1(-0.95,0) 2(0.95,0)
  silkscreen extent 0,-0.53 0,0.53, body extent -1,-0.63 1,0.63, height 0.6
RLS126 [mm]
  rect 2x3.5 smd: 1(-1.4,0) 2(1.4,0)
  silkscreen extent -0.2,-1.6 0.2,1.6, body extent -2.25,-1.6 2.25,1.6, height 2.6
SJ13515SMTTR [mm]
  rect 3x2 smd: 1(4.85,1.7) 2(-4.85,-4.8)
  rect 3x1.5 smd: 3(4.85,-4.5) 10(-4.85,-0.4) 11(4.85,-1.6)
  round 0.9 hole 1.8 unplated: 12(-0.25,-4.5) 13(-0.25,1.5)
  silkscreen extent -4.75,-7.5 4.75,7.5, body extent -6.19,-7.34 5.81,7.66, height 5.08
SOIC127P600X175-16N [mm]
  rect 1.525x0.65 smd: 1(-2.712,4.445) 2(-2.712,3.175) 3(-2.712,1.905) 4(-2.712,0.635) 5(-2.712,-0.635) 6(-2.712,-1.905) 7(-2.712,-3.175) 8(-2.712,-4.445) 9(2.712,-4.445) 10(2.712,-3.175) 11(2.712,-1.905) 12(2.712,-0.635) 13(2.712,0.635) 14(2.712,1.905) 15(2.712,3.175) 16(2.712,4.445)
  silkscreen extent -3.47,-4.95 1.6,5.12, body extent -3.01,-4.94 3.01,4.96, height 1.75
SOIC127P1030X265-16N [mm]
  rect 1.95x0.65 smd: 1(-4.725,4.445) 2(-4.725,3.175) 3(-4.725,1.905) 4(-4.725,0.635) 5(-4.725,-0.635) 6(-4.725,-1.905) 7(-4.725,-3.175) 8(-4.725,-4.445) 9(4.725,-4.445) 10(4.725,-3.175) 11(4.725,-1.905) 12(4.725,-0.635) 13(4.725,0.635) 14(4.725,1.905) 15(4.725,3.175) 16(4.725,4.445)
  silkscreen extent -5.7,-5.15 3.4,5.15, body extent -5.17,-5.15 5.17,5.15, height 2.59
SOP65P778X199-28N [mm]
  rect 1.705x0.45 smd: 1(-3.498,4.225) 2(-3.498,3.575) 3(-3.498,2.925) 4(-3.498,2.275) 5(-3.498,1.625) 6(-3.498,0.975) 7(-3.498,0.325) 8(-3.498,-0.325) 9(-3.498,-0.975) 10(-3.498,-1.625) 11(-3.498,-2.275) 12(-3.498,-2.925) 13(-3.498,-3.575) 14(-3.498,-4.225) 15(3.498,-4.225) 16(3.498,-3.575) 17(3.498,-2.925) 18(3.498,-2.275) 19(3.498,-1.625) 20(3.498,-0.975) 21(3.498,-0.325) 22(3.498,0.325) 23(3.498,0.975) 24(3.498,1.625) 25(3.498,2.275) 26(3.498,2.925) 27(3.498,3.575) 28(3.498,4.225)
  silkscreen extent -4.35,-5.1 2.29,5.1, body extent -3.89,-5.1 3.89,5.1, height 1.99
SOP254P962X315-4N [mm]
  rect 1.9x0.75 smd: 1(-4.3,1.27) 2(-4.3,-1.27) 3(4.3,-1.27) 4(4.3,1.27)
  silkscreen extent -5.25,-2.39 3,2.39, body extent -4.81,-2.39 4.81,2.39, height 3.15
SOT95P280X145-6N [mm]
  rect 1.25x0.6 smd: 1(-1.25,0.95) 2(-1.25,0) 3(-1.25,-0.95) 4(1.25,-0.95) 5(1.25,0) 6(1.25,0.95)
  silkscreen extent -1.88,-1.45 0.28,1.6, body extent -1.32,-1.4 1.48,1.5, height 1.2
SOT96P237X111-3N [mm]
  rect 1.25x0.6 smd: 1(-1.05,0.955) 2(-1.05,-0.955) 3(1.05,0)
  silkscreen extent -1.68,-1.46 0.08,1.51, body extent -1.18,-1.46 1.18,1.46, height 1.11
SRR4028 [mm]
  rect 5.3x2 smd: 1(0,-1.75) 2(0,1.75)
  silkscreen extent -2.4,-3.3 2.4,0.5, body extent -2.4,-2.4 2.4,2.4, height 2.8
TB001-500-02BE [mm]
  rect 1.7x3 hole 1.3: 1(0,0)
  oval 1.7x3 hole 1.3: 2(-5,0)
  silkscreen extent -7.5,-4 3.2,5, body extent -8.05,-4 2.45,5, height 12.5
TS1187ABAB [mm]
  rect 1x0.75 smd: A1(-3,1.875) B1(3,1.875) C1(-3,-1.875) D1(3,-1.875)
  silkscreen extent -4.5,-2.55 2.55,2.55, body extent -3.2,-2.55 3.3,2.55, height 1.5

## Part data
BT1: "Battery holder CR2032, SMD", Manufacturer_Name="TE Connectivity", Assembly=PCBWay, Datasheet Link=https://www.te.com/commerce/DocumentDelivery/DDEController?Action=showdoc&DocId=Customer+Drawing%7FC-BAT-HLD-001-xx%7FE%7Fpdf%7FEnglish%7FENG_CD_C-BAT-HLD-001-xx_E.pdf%7FBAT-HLD-001, Height=4.3mm, Manufacturer_Part_Number=BAT-HLD-001, Supplier=PCBWay, Supplier PN="LCSC C7501066"
C1 C9 C11 C15 C17 C31: "Capacitor", Manufacturer_Name=KEMET, Manufacturer_Part_Number=C0805C102J5GACTU, Assembly=PCBWay, Datasheet Link=https://www.kemet.com/specsheet/C0805C102J5GACTU, Height=0.88mm, Supplier=PCBWay, Supplier PN="LCSC C2167084"
C2 C3: "Capacitor Polarised", Manufacturer_Name=Panasonic, Assembly=PCBWay, Datasheet Link=http://industrial.panasonic.com/cdbs/www-data/pdf/RDE0000/ABA0000C1181.pdf, Supplier=PCBWay
  C2: Height=10.8mm, Manufacturer_Part_Number=EEE-FK1V101P, Supplier PN="LCSC C128462"
  C3: Height=7.8mm, Manufacturer_Part_Number=EEE-FK1C101P, Supplier PN="LCSC C128532"
C4 C5 C6 C7 C8 C10 C12 C13 C14 C18 C21 C24 C25 C28 C29 C30 C32 C33 C34 C35 C36 C37 C38 C39 C40: "Capacitor", Manufacturer_Name="Samsung Electro-Mechanics", Assembly=PCBWay, Supplier=PCBWay
  C4 C5 C33: Datasheet Link=https://datasheet.datasheetarchive.com/originals/distributors/Datasheets-DGA10/2406310.pdf, Height=1.4mm, Manufacturer_Part_Number=CL21A226MAQNNNE, Supplier PN="LCSC C45783"
  C6: Datasheet Link=https://datasheet.datasheetarchive.com/originals/distributors/DKDS-19/375194.pdf, Height=1.8mm, Manufacturer_Part_Number=CL31B106KBHNNNE, Supplier PN="LCSC C89632"
  C7 C8 C18 C21 C24 C37: Datasheet Link=https://datasheet.datasheetarchive.com/originals/distributors/Datasheets_SAMA/6a45835c9b7400e9b49c55c38a8ff4a2.pdf, Height=1.45mm, Manufacturer_Part_Number=CL21A106KAYNNNE, Supplier PN="LCSC C15850"
  C10 C14 C30 C32: Height=0.88mm, Manufacturer_Part_Number=CL21B105KAFNNNE, Supplier PN="LCSC C116352"
  C12 C13 C25 C28 C29 C34 C35 C36 C38 C39 C40: Height=0.88mm, Manufacturer_Part_Number=CL21B104KBCNNNC, Supplier PN="LCSC C1711"
C16: "Capacitor ceramico 100 nF 50 V C0G 5% 1206", Manufacturer_Name=Murata, Assembly=PCBWay, Manufacturer_Part_Number=GRM31C5C1H104JA01L, Supplier=PCBWay, Supplier PN="LCSC C97946"
C19 C22 C26 C27: "Capacitor", Manufacturer_Name=KEMET, Assembly=PCBWay, Height=0.88mm, Supplier=PCBWay
  C19 C22: Datasheet Link=https://www.kemet.com/specsheet/C0805C472J5GACTU, Manufacturer_Part_Number=C0805C472J5GACTU, Supplier PN="LCSC C2170898"
  C26 C27: Datasheet Link=https://www.kemet.com/specsheet/C0805C120J5GACTU, Manufacturer_Part_Number=C0805C120J5GACTU, Supplier PN="LCSC C2168859"
C20 C23: "Capacitor ceramico 33 nF 50 V C0G 5% 1206", Manufacturer_Name=Murata, Assembly=PCBWay, Manufacturer_Part_Number=GRM3195C1H333JA01D, Supplier=PCBWay, Supplier PN="LCSC C97930"
D1 D2: "Schottky Diode", Manufacturer_Name=Vishay, Manufacturer_Part_Number=SS34-E3/57T, Assembly=PCBWay, Datasheet Link=https://www.vishay.com/docs/88751/ss32.pdf, Height=2.62mm, Supplier=PCBWay, Supplier PN="LCSC C13354"
D3: "TVS Diode (Uni-directional)", Manufacturer_Name=Littelfuse, Assembly=PCBWay, Datasheet Link=http://www.vishay.com/docs/88392/smbj.pdf, Height=2.44mm, Manufacturer_Part_Number=SMBJ15A, Supplier=PCBWay, Supplier PN="LCSC C83846"
D4: "TVS Diode (Bi-directional)", Manufacturer_Name=Littelfuse, Assembly=PCBWay, Datasheet Link=http://www.littelfuse.com/~/media/electronics/datasheets/tvs_diodes/littelfuse_tvs_diode_smaj_datasheet.pdf.pdf, Height=2.29mm, Manufacturer_Part_Number=SMAJ5.0CA, Supplier=PCBWay, Supplier PN="LCSC C83324"
D5 D6: "Integrated Circuit", Manufacturer_Name=STMicroelectronics, Assembly=PCBWay, Datasheet Link=https://www.st.com/resource/en/datasheet/usblc6-2.pdf, Height=1.45mm, Manufacturer_Part_Number=USBLC6-2SC6, Supplier=PCBWay, Supplier PN="LCSC C7519"
F1 F2: "Fusible SMD UMT-H T1A 277 VAC, ruptura 1500 A (bolsa)", Manufacturer_Name=Schurter, Assembly=PCBWay, Manufacturer_Part_Number=3403.0274.11, Supplier=PCBWay, Supplier PN="LCSC C6384960"
F1B F2B: "Portafusible 5x20 mm para PCB, 2 pines a 22 mm (XC Electronics BLX-A, LCSC C3131)", Manufacturer_Name="XC Electronics", Assembly=DNP, Manufacturer_Part_Number=BLX-A, Supplier=Sigma, Supplier PN=BLX-A
FB1: "Ferrite Bead", Manufacturer_Name=Murata, Assembly=PCBWay, Datasheet Link=https://datasheet.datasheetarchive.com/originals/dk/DKDS-31/605570.pdf, Height=1.05mm, Manufacturer_Part_Number=BLM21PG221SN1D, Supplier=PCBWay, Supplier PN="LCSC C85840"
J1 J2: "Bornera de tornillo 2 polos, paso 5.0 mm, 300 V 15 A, 22-14 AWG", Manufacturer_Name=Xinlaiya, Assembly=PCBWay, Manufacturer_Part_Number=XY301V-A-5.0-2P, Supplier=PCBWay, Supplier PN="LCSC C557651"
J3: "Connector", Manufacturer_Name="Same Sky", Assembly=PCBWay, Datasheet Link=https://www.sameskydevices.com/product/resource/sj1-351x-smt.pdf, Height=5.3mm, Manufacturer_Part_Number=SJ1-3515-SMT-TR, Supplier=PCBWay, Supplier PN="LCSC C22359767"
J4 J6 J7: "Connector", Manufacturer_Name="Phoenix Contact", Assembly=PCBWay, Height=8.65mm, Supplier=PCBWay
  J4: Datasheet Link=https://www.phoenixcontact.com/en-us/products/printed-circuit-board-terminal-mkds-1-3-35-1751251?type=pdf, Manufacturer_Part_Number=1751251, Supplier PN="LCSC C91152"
  J6 J7: Datasheet Link=https://www.phoenixcontact.com/en-us/products/printed-circuit-board-terminal-mkds-1-2-35-1751248?type=pdf, Manufacturer_Part_Number=1751248, Supplier PN="LCSC C89122"
J5: library part CMP-1502-03214-4, "Conn USB 3.1 Type C RCP 24 POS 0.5mm/0.4mm Solder RA SMD/Thru-Hole 24 Terminal 1 Port T/R", Contact Resistance=30mΩ, Current Rating=5A, Insulation Resistance=1GΩ, Manufacturer_Name="Wurth Elektronik", Max Operating Temperature=105°C, Min Operating Temperature=-40°C, Voltage Rating=20V, Assembly=PCBWay, Connector Type=USB, Contact Material="Gold, Nickel", Gender=Receptacle, Height=3.21mm, Manufacturer_Part_Number=632723300011, Mount="Surface Mount, Through Hole", Number of Contacts=24, Number of Pins=24, Orientation=Horizontal, Packaging="Tape and Reel", Pin Length=1.9mm, RoHS=Compliant, Supplier=PCBWay, Supplier PN="LCSC C2830802", USB Standard="USB 3.1"
J8: "Connector", Manufacturer_Name="Wurth Elektronik", Assembly=PCBWay, Datasheet Link=https://www.we-online.com/components/products/datasheet/61300611121.pdf, Height=8.94mm, Manufacturer_Part_Number=61300611121, Supplier=PCBWay, Supplier PN="LCSC C5444523"
K1: library part AQY-414EHAX, "PhotoMOS 1 Form B (NC), 400 V 120 mA, reinforced insulation 5000 Vrms, SMD DIP-4", Manufacturer_Name=Panasonic, Assembly=Manual, Datasheet Link=https://www3.panasonic.biz/ac/cdn/e/control/relay/photomos/catalog/semi_eng_ge1b_aqy41_e.pdf, Height=3.15mm, Manufacturer_Part_Number=AQY414EHAX, Supplier=DigiKey, Supplier PN=255-6089-1-ND
L1: "Inductor 12 uH 5% 420 mA 0.25 ohm 1812, AEC-Q200", Manufacturer_Name=Murata, Assembly=PCBWay, Manufacturer_Part_Number=LQH43NH120J03L, Supplier=PCBWay, Supplier PN="LCSC C3224514"
L2: "Inductor", Manufacturer_Name=Bourns, Assembly=PCBWay, Datasheet Link=https://www.bourns.com/pdfs/SRR4028.pdf, Manufacturer_Part_Number=SRR4028-2R2Y, Supplier=PCBWay, Supplier PN="LCSC C2041777"
LED1 LED2 LED3 LED4 LED5: "LED", Manufacturer_Name=Kingbright, Assembly=PCBWay, Supplier=PCBWay
  LED1 LED2 LED3 LED4: Datasheet Link=http://www.us.kingbright.com/images/catalog/SPEC/APT2012SGC.pdf, Height=0.85mm, Manufacturer_Part_Number=APT2012SGC, Supplier PN="LCSC C5353439"
  LED5: Manufacturer_Part_Number=APT2012SURCK, Supplier PN="LCSC C5875730"
LED6: "LED yellow 0805, 590 nm", Manufacturer_Name="Hubei KENTO Electronic", Assembly=PCBWay, Datasheet Link=https://www.lcsc.com/datasheet/C2296.pdf, Manufacturer_Part_Number=KT-0805Y, Supplier=PCBWay, Supplier PN="LCSC C2296"
PS1: "Power Supply", Manufacturer_Name="Mean Well", Assembly=PCBWay, Datasheet Link=https://www.meanwell.com/Upload/PDF/IRM-20/IRM-20-SPEC.PDF, Height=24mm, Manufacturer_Part_Number=IRM-20-12, Supplier=PCBWay, Supplier PN="LCSC C5278499"
Q1 Q2: "Transistor BJT NPN", Manufacturer_Name=onsemi, Assembly=PCBWay, Datasheet Link=https://www.onsemi.com/pub/Collateral/MMBT3904LT1-D.PDF, Height=1.11mm, Manufacturer_Part_Number=MMBT3904LT1G, Supplier=PCBWay, Supplier PN="LCSC C81464"
Q3: "MOSFET N-channel 30V 5.7A, Rds(on) 48mR max at Vgs 2.5V, SOT-23", Manufacturer_Name="Alpha & Omega Semiconductor", Assembly=PCBWay, Datasheet Link=https://www.aosmd.com/res/datasheets/AO3400A.pdf, Manufacturer_Part_Number=AO3400A, Supplier=PCBWay, Supplier PN="LCSC C20917"
R1 R7 R8 R15 R16 R17 R18 R19 R20 R21 R22 R23 R24 R25 R26 R27 R28 R29 R30 R31 R32 R33 R34 R35 R36 R37 R38 R39 R40 R41: "Resistor", Manufacturer_Name=Yageo, Assembly=PCBWay, Supplier=PCBWay
  R1 R8 R15 R17 R25 R26 R28 R29 R30 R31 R39 R41: Datasheet Link=https://www.yageo.com/upload/media/product/productsearch/datasheet/rchip/PYu-RC_Group_51_RoHS_L_11.pdf, Height=0.6mm, Manufacturer_Part_Number=RC0805FR-071KL, Supplier PN="LCSC C95781"
  R7: Datasheet Link=https://www.yageo.com/upload/media/product/productsearch/datasheet/rchip/PYu-RC_Group_51_RoHS_L_12.pdf, Height=0.55mm, Manufacturer_Part_Number=RC0805FR-0747KL, Supplier PN="LCSC C126351"
  R16 R18 R22 R27 R34 R40: Datasheet Link=https://www.yageo.com/upload/media/product/productsearch/datasheet/rchip/PYu-RC_Group_51_RoHS_L_12.pdf, Height=0.55mm, Manufacturer_Part_Number=RC0805FR-0710KL, Supplier PN="LCSC C84376"
  R19 R20: Manufacturer_Part_Number=RC0805FR-0712KL, Supplier PN="LCSC C114556"
  R21 R32 R33 R35: Manufacturer_Part_Number=RC0805FR-074K7L, Supplier PN="LCSC C60816"
  R23 R24: Manufacturer_Part_Number=RC0805FR-075K1L, Supplier PN="LCSC C84375"
  R36: Manufacturer_Part_Number=RC0805FR-07100RL, Supplier PN="LCSC C105577"
  R37: Manufacturer_Part_Number=RC1206FR-0768RL, Supplier PN="LCSC C137238"
  R38: Manufacturer_Part_Number=RC0805FR-07330RL, Supplier PN="LCSC C105878"
R2 R3 R4 R5 R6 R9 R10 R12 R14: "Resistor", Manufacturer_Name=Panasonic, Assembly=PCBWay, Supplier=PCBWay
  R2 R3 R4 R5: Datasheet Link=http://industrial.panasonic.com/cdbs/www-data/pdf/RDO0000/AOA0000C331.pdf, Height=0.7mm, Manufacturer_Part_Number=ERJ-P08F1004V, Supplier PN="LCSC C41369755"
  R6: Height=0.55mm, Manufacturer_Part_Number=ERA-6AEB103V, Supplier PN="LCSC C191101"
  R9 R12: Height=0.55mm, Manufacturer_Part_Number=ERA-6AEB203V, Supplier PN="LCSC C473304"
  R10 R14: Height=0.55mm, Manufacturer_Part_Number=ERA-6AEB133V, Supplier PN="LCSC C445658"
R11 R13: "Resistencia de pelicula delgada 10 ohm 0.1% 25 ppm 0805", Manufacturer_Name=Yageo, Assembly=PCBWay, Manufacturer_Part_Number=RT0805BRD0710RL, Supplier=PCBWay, Supplier PN="LCSC C865142"
RV1: "Varistor SMD 300 VAC, 470 V, 2500 A (8/20 us), 30 J, 4032", Manufacturer_Name=Ruilon, Assembly=PCBWay, Manufacturer_Part_Number=RL4032P471KJ, Supplier=PCBWay, Supplier PN="LCSC C2935514"
SW1 SW2 SW3: "Tact switch 5.1 x 5.1 x 1.5 mm, 160 gf, 50 mA 12 VDC", Manufacturer_Name="XKB Connectivity", Datasheet Link=http://www.helloxkb.com/public/images/pdf/TS-1187A-X-X-X.pdf, Height=4.05mm, Manufacturer_Part_Number=TS-1187A-B-A-B, Supplier=PCBWay, Supplier PN="LCSC C318884"
  SW1: Assembly=PCBWay
  SW2 SW3: Assembly=DNP
TP1 TP2 TP3 TP4 TP5 TP6: library part CMP-2000-05178-1, "Test Point, 1-Pin SMT, RoHS, Tape and Reel", Manufacturer=Keystone, Manufacturer_Name="Keystone Electronics", Package Description="1-Pin Test Point, Body 3.81 x 2.04 mm", Standard Package=1, Assembly=PCBWay, Catalog Drawings="5016Top /  / 5016Side /  / 5016Front", Category=TestandMeasurement, Datasheet URL=https://ciiva.com/datasheet-click-2917613?src=ciiva&sig=4a4e90f, Datasheet Version="Rev. D, 03/2014", Family=TestPoints, Featured Product="SurfaceMountTestPoints /  / 5019MiniatureSurfaceMountTestPoint", Manufacturer URL=http://www.keyelco.com/, Manufacturer_Part_Number=5016, Material=PhosphorBronze, Mounting Type=SurfaceMount, Online Catalog=SurfaceMountTestPoints, Other Names=5016KDKR, Package Reference=5016, Packaging=Digi-Reel, RoHS Information=RoHSComplianceStatement, Supplier=PCBWay, Supplier PN="LCSC C238129", Terminal="0.015\"(0.38mm)PhosphorBronze,SilverPlated", Type=PCTestPoint,Compact
U1: "Regulador conmutado 3.3 V 0.5 A, SIP3", Manufacturer_Name="RECOM Power", Assembly=Manual, Datasheet Link=https://recom-power.com/pdf/Innoline/R-78CK-0.5.pdf, Height=10.7mm, Manufacturer_Part_Number=R-78CK3.3-0.5, Supplier=Disponible, Supplier PN=-
U2: "Amplificador aislado +-1 V con DC/DC integrado, aislamiento reforzado, SOIC-16 DWE (carrete)", Manufacturer_Name="Texas Instruments", Assembly=PCBWay, Manufacturer_Part_Number=AMC3330DWER, Supplier=PCBWay, Supplier PN="LCSC C2999368"
U3: "Integrated Circuit", Manufacturer_Name=Microchip, Assembly=PCBWay, Datasheet Link=http://ww1.microchip.com/downloads/en/DeviceDoc/Atmel-46002-SE-M90E26-Datasheet.pdf, Height=1.99mm, Manufacturer_Part_Number=ATM90E26-YU-R, Supplier=PCBWay, Supplier PN="LCSC C616398"
U4: "Integrated Circuit", Manufacturer_Name="Espressif Systems", Assembly=PCBWay, Datasheet Link=https://www.espressif.com/sites/default/files/documentation/esp32-s3-wroom-1_wroom-1u_datasheet_en.pdf, Height=3.25mm, Manufacturer_Part_Number=ESP32-S3-WROOM-1-N16R2, Supplier=PCBWay, Supplier PN="LCSC C2913205"
U5: "USB to UART bridge", Manufacturer_Name=WCH, Assembly=PCBWay, Datasheet Link=https://www.wch-ic.com/downloads/CH340DS1_PDF.html, Height=1.75mm, Manufacturer_Part_Number=CH340C, Supplier=PCBWay, Supplier PN="LCSC C84681"
U6: "Integrated Circuit", Manufacturer_Name=Aosong, Assembly=PCBWay, Datasheet Link=https://www.lcsc.com/datasheet/C2757850.pdf, Height=1.1mm, Manufacturer_Part_Number=AHT20, Supplier=PCBWay, Supplier PN="LCSC C2757850"
U7: "I2C RTC with integrated TCXO and crystal, VBAT, SO-16W", Manufacturer_Name="Analog Devices", Manufacturer_Part_Number=DS3231SN#T&R, Assembly=PCBWay, Datasheet Link=https://www.analog.com/media/en/technical-documentation/data-sheets/DS3231.pdf, Height=2.65mm, Supplier=PCBWay, Supplier PN="LCSC C9866"
Y1: "Crystal or Oscillator", Manufacturer_Name=ECS, Assembly=PCBWay, Datasheet Link=https://datasheet.datasheetarchive.com/originals/distributors/Datasheets_SAMA/a25c19192314839168edce8dcea0d59f.pdf, Height=1.1mm, Manufacturer_Part_Number=ECS-81.92-12-30Q-EN-TR, Supplier=PCBWay, Supplier PN="LCSC C2450755"

## Free pads (board coordinates)
  round 1 smd mask+0.5: FID1(56,40) FID2(123,34.75) FID3(97.75,74.5)
  round 3.2 hole 3.2 unplated: M1(4,4) M2(126,4) M3(4,96) M4(126,96)

## Via types
v1: diameter 0.8, hole 0.4, Top Layer to Bottom Layer, tented both sides, 193 vias
v2: diameter 0.6, hole 0.3, Top Layer to Bottom Layer, tented both sides, 59 vias